# Altium PCB NB3000XN.PcbDoc (part 46 of 71)
Units mil, origin at the board's own origin, x right, y up, seen from the top; angles counter-clockwise.
Board outline 9527.56 x 6929.77 mil, 6 copper layers (Top Layer, GND+SHIELD, MidLayer1, MidLayer2, P2 - 3V3+5V0, Bottom Layer), stack 62.375 mil thick; 832 components, 1027 nets, 4655 pads, 4981 vias.
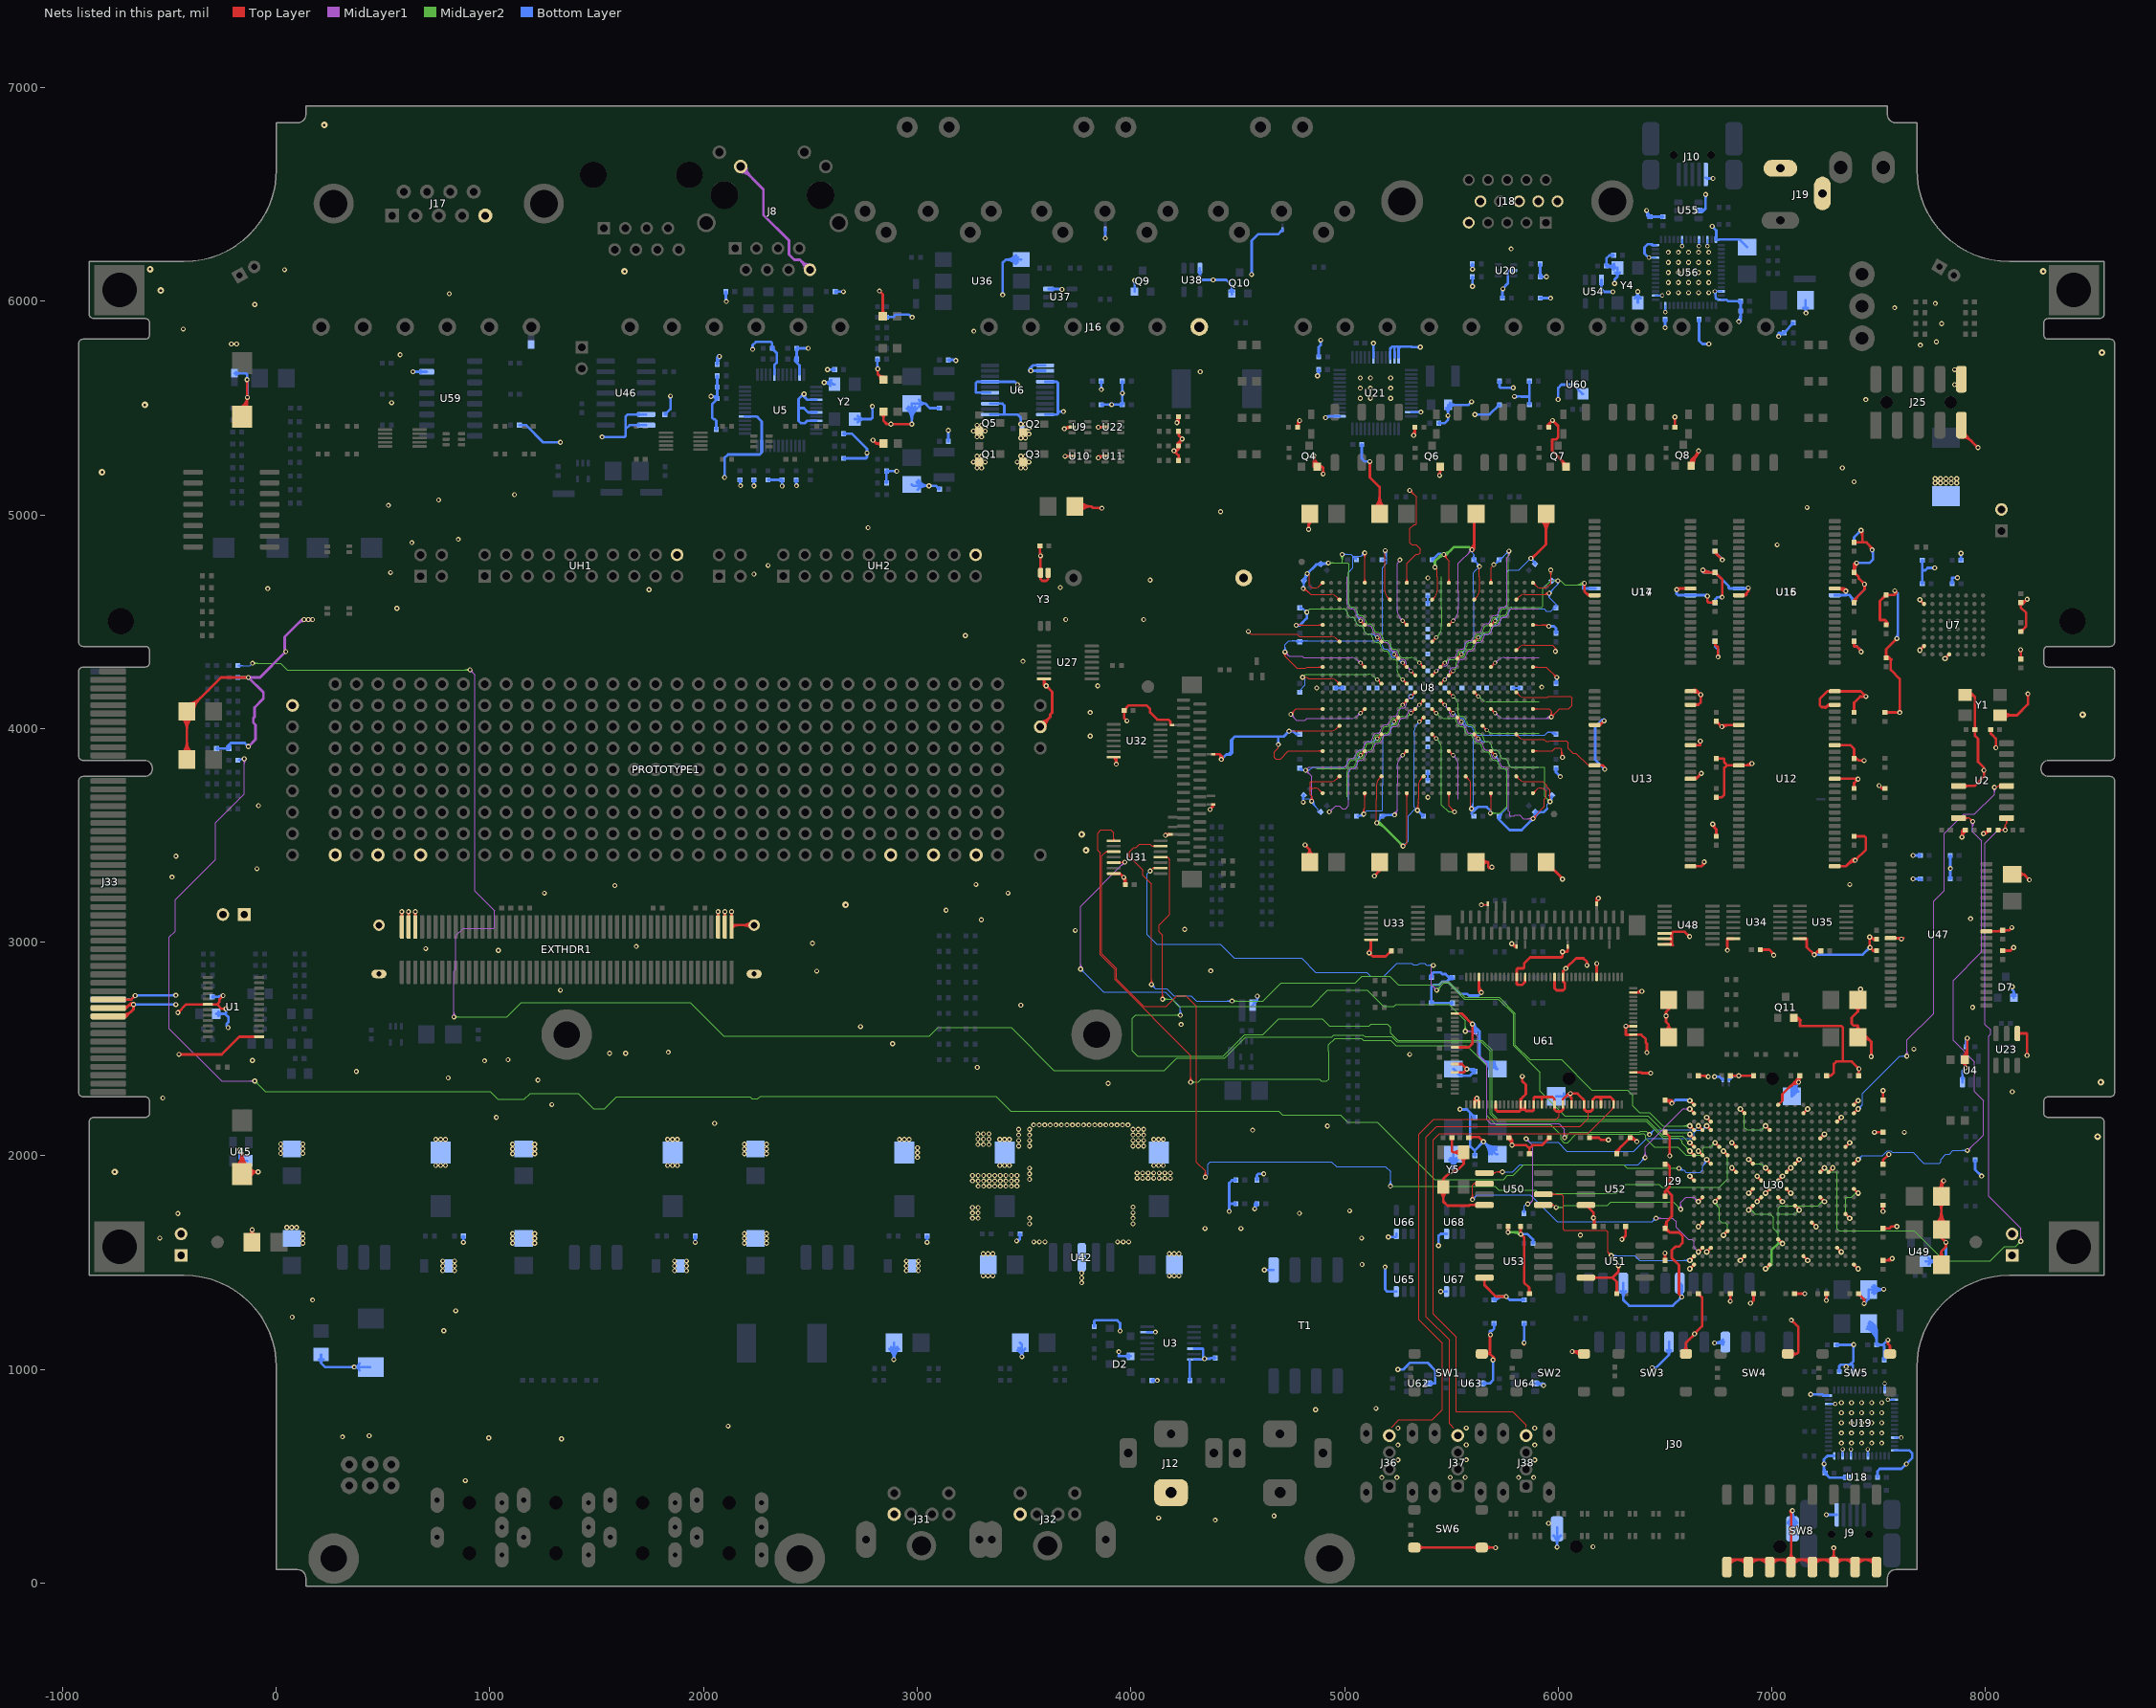
[diagram p50: the nets of this part, all layers, seen from the top]

## Via types
v1: diameter 23, hole 11.81, Top Layer to Bottom Layer, 3672 vias
v2: diameter 26, hole 11.81, Top Layer to Bottom Layer, 461 vias
v3: diameter 19, hole 11.81, Top Layer to Bottom Layer, tented both sides, 396 vias
v4: diameter 23.62, hole 11.81, Top Layer to Bottom Layer, 288 vias
v5: diameter 20, hole 11.81, Top Layer to Bottom Layer, 91 vias
v6: diameter 23, hole 11.81, Top Layer to Bottom Layer, tented both sides, 50 vias
v7: diameter 31, hole 11.81, Top Layer to Bottom Layer, 15 vias
v8: diameter 27.56, hole 11.81, Top Layer to Bottom Layer, tented both sides, 4 vias
v9: diameter 29, hole 11.81, Top Layer to Bottom Layer, 3 vias
v10: diameter 21, hole 11.81, Top Layer to Bottom Layer, 1 vias

## Nets (pads, with @x,y where several pads share a name; then routed paths per layer and width w, separated by ;. In a path a pad name is that pad's centre, name@x,y a point inside that pad or via, vN(x,y) a via of type N, cw(c..) or ccw(c..) an arc to the next point about the centre after c; other vN are vias at no path point) (continued)
GND: (continued)
  Bottom Layer w12: v1@7431.86,1313.87 ccw(c7431.86,1327.15) 7441.25,1317.76 ccw(c7450.64,1308.37) v1@7437.36,1308.37 ; v1(7433.86,4676.04) 7433.86,4651.04 7385.19,4602.37 ; v1@7453.69,2975.04 cw(c7440.41,2975.04) 7449.8,2965.65 cw(c7459.19,2956.26) v1@7459.19,2969.54 ; v1@7465.64,4832.71 cw(c7446.59,4813.66) 7473.52,4813.66 ; C93.2@7469.71,1360.69 cw(c7497.3,1338.74) 7497.3,1374 cw(c7497.3,1409.26) C93.2@7469.71,1387.31 ; C93.2@7479.1,1353.22 cw(c7522.19,1318.94) v1@7522.19,1374 ; C93.2@7479.11,1394.78 ccw(c7522.19,1429.05) v1@7522.19,1374 ; v4(7480,2110) v4@7481.86,2110 ; C90.1@7494.33,495 7494.33,524.33 7505,535 7606.86,535 v1(7629.73,557.88) 7656.86,585 7656.86,608.37 ; 7506.93,1374 ccw(c7506.93,1391.97) v1@7519.64,1379.26 ; v1@7522.52,1374.33 v1@7522.19,1374 ; v1@7522.52,1374.37 v1(7523.52,1375.37) ; v4(7547.7,2006.4) v4@7548.6,2006.4 ; v1(7575.52,4645.04) 7590.19,4630.37 7590.19,4426.37 v1(7585.19,4421.37) ; v1@7581.3,4425.26 ccw(c7559.84,4446.72) 7590.19,4446.72 ; v1@7660,3405 v1(7661.18,3406.18) C238.2@7695.39,3406.18 C238.2@7694.21,3405 ; v1@7661.18,3296.18 C222.2@7695.39,3296.18 ; v1@7665.07,3292.48 cw(c7673.99,3283.56) 7673.99,3296.18 ; v1@7665.07,3300.26 ccw(c7674.92,3310.12) 7674.92,3296.18 ; v1@7665.07,3402.29 cw(c7674.46,3392.9) 7674.46,3406.18 cw(c7674.46,3419.46) v1@7665.07,3410.07 ; C222.2@7691.28,3292.07 ccw(c7681.36,3282.15) 7681.36,3296.18 ccw(c7681.36,3310.21) C222.2@7691.28,3300.29 ; C238.2@7691.28,3402.07 ccw(c7681.36,3392.15) 7681.36,3406.18 ccw(c7681.36,3420.21) C238.2@7691.28,3410.29 ; C222.2@7695.39,3291.71 C222.2@7699.52,3291.71 ; C228.2@7699.55,4682.11 ccw(c7689.63,4692.03) 7703.66,4692.03 ccw(c7717.69,4692.03) C228.2@7707.77,4682.11 ; C227.2@7699.55,4783.89 cw(c7689.63,4773.97) 7703.66,4773.97 cw(c7717.69,4773.97) C227.2@7707.77,4783.89 ; C228.2@7703.66,4678 7703.66,4740 ; C227.2@7703.66,4788 7703.66,4740 ; U49.1@7719.07,1506.69 7806.69,1506.69 7815.19,1515.19 v1(7815.19,1595.04) ; U49.1@7733.62,1492.14 cw(c7768.75,1457.02) 7768.75,1506.69 cw(c7768.75,1556.36) U49.1@7733.62,1521.24 ; v1@7758.3,4748.15 ccw(c7748.91,4738.76) 7748.91,4752.04 ccw(c7748.91,4765.32) v1@7758.3,4755.93 ; v1(7762.19,4752.04) 7728.86,4752.04 7717.86,4741.04 7704.7,4741.04 7703.66,4740 ; C254.2@7831.28,3300.29 ccw(c7821.36,3310.21) 7835.39,3310.21 ccw(c7849.42,3310.21) C254.2@7839.5,3300.29 ; C253.2@7831.28,3402.07 cw(c7821.36,3392.15) 7835.39,3392.15 cw(c7849.42,3392.15) C253.2@7839.5,3402.07 ; v1@7831.64,3341.15 cw(c7822.58,3332.1) 7835.39,3332.1 ; v1@7831.64,3348.93 ccw(c7822.58,3357.99) 7835.39,3357.99 ; C254.2@7835.39,3296.18 7835.39,3344.9 v1(7835.52,3345.04) 7835.39,3345.18 C253.2@7835.39,3406.18 ; 7835.39,3331.43 cw(c7849.14,3331.43) v1@7839.41,3341.15 ; 7835.39,3358.65 ccw(c7849.14,3358.65) v1@7839.41,3348.93 ; C248.2@7839.55,4682.11 ccw(c7829.63,4692.03) 7843.66,4692.03 ccw(c7857.69,4692.03) C248.2@7847.77,4682.11 ; C248.2@7843.66,4678 7843.66,4705.9 7843.8,4706.04 v1(7868.52,4706.04) ; v1@7864.64,4702.15 ccw(c7855.25,4692.76) 7855.25,4706.04 ccw(c7855.25,4719.32) v1@7864.64,4709.93 ; C247.2@7880.89,4792.11 ccw(c7870.97,4802.03) 7885,4802.03 ccw(c7899.03,4802.03) C247.2@7889.11,4792.11 ; v1@7881.3,4816.49 cw(c7872.37,4807.56) 7885,4807.56 ; v1@7881.86,4823.71 v1@7885,4820.56 ; C247.2@7885,4788 7885,4820.37 v1@7885,4820.56 ; 7885,4806.64 cw(c7898.93,4806.64) v1@7889.08,4816.49 ; v1(7885.19,4820.37) v1@7885,4820.56 ; U4.3@7888.49,2362.77 ccw(c7878.57,2372.69) 7892.6,2372.69 ccw(c7906.63,2372.69) U4.3@7896.71,2362.77 ; U4.3@7892.6,2344.88 7892.6,2397.78 v1(7906.86,2412.04) ; C39.1@7905.22,2514.11 ccw(c7895.3,2524.03) 7909.33,2524.03 ccw(c7923.36,2524.03) C39.1@7913.44,2514.11 ; C39.1@7909.33,2510 7909.33,2545.37 7914.66,2550.71 v1(7914.86,2550.71) ; 7909.33,2524.09 cw(c7941.48,2524.09) v1@7918.75,2546.82 ; R163.1@7947.42,1977.41 cw(c7938.34,1968.33) 7951.18,1968.33 cw(c7964.02,1968.33) R163.1@7954.94,1977.41 ; R163.1@7951.18,1981.67 7951.18,1935.68 7981.76,1905.1 v1@7981.86,1905 ; 7972.14,1914.72 ccw(c7981.86,1924.44) v1@7981.86,1910.69 ; 7972.61,1914.25 cw(c7963.55,1905.19) v1@7976.36,1905.19 ; D7.1@8124.12,2749.06 ccw(c8104.11,2769.06) 8132.4,2769.06 ccw(c8160.69,2769.06) D7.1@8140.69,2749.06 ; v1@8126.9,2793.42 8124.74,2795.59 8124.65,2795.59 8125.19,2795.04 v1(8125.19,2791.71) 8125.19,2777.21 8132.4,2770 D7.1@8132.4,2739.79 ; -239.81,2665 -223.5,2648.69 -223.5,2626.09 -233,2616.59 ; 210,1030 228.29,1011.71 v1(365.19,1011.71) v1@365.19,1011.81 ; v1@2435,5141.71 2435.19,5141.71 v1(2435.19,5136.71) 2432.52,5139.37 2434.86,5141.71 v1@2435,5141.71 ; v1@2435,5141.71 2434,5142.71 R41.2@2434,5163.82 2435,5163.82 v1@2435,5141.71 ; 2435.67,5715.97 cw(c2449.7,5715.97) 2439.78,5725.89 ccw(c2449.7,5715.97) 2435.67,5715.97 ; 2435.67,5715.97 ccw(c2421.64,5715.97) 2431.56,5725.89 cw(c2421.64,5715.97) 2435.67,5715.97 ; C47.1@2435.67,5775.04 2438.15,5777.52 C47.1@2440.63,5780 ; C47.1@2435.67,5775.04 C47.1@2435.67,5780 C47.1@2440.63,5780 ; 2445,5455 2445,5500 ; U38.3@4319.14,6137.23 cw(c4308.54,6126.63) 4323.52,6126.63 ccw(c4308.54,6126.63) U38.3@4319.14,6137.23 ; U38.3@4319.14,6137.23 cw(c4309.21,6127.31) 4323.24,6127.31 cw(c4337.27,6127.31) U38.3@4327.35,6137.23 ; U38.3@4327.35,6137.23 ccw(c4336.6,6127.99) 4323.52,6127.99 cw(c4336.6,6127.99) U38.3@4327.35,6137.23 ; 4455,3879.04 4466.19,3879.04 4474.86,3887.71 4474.86,3951.04 ; 4455,3879.04 4468.86,3892.9 4468.86,3945.04 4474.86,3951.04 ; 4474.86,3951.04 4485.86,3962.04 4690.19,3962.04 ; v1@4917.69,4774.2 v1(4924.52,4775.04) 4918.52,4775.04 v1@4917.69,4774.2 ; 5235,5788.21 5263.21,5788.21 ; 5415.06,2858.37 5449.91,2858.37 5457.78,2850.5 5473.06,2850.5 5493.52,2830.04 ; 5480.19,2816.71 5493.52,2830.04 ; 5573.96,2216.71 5587.52,2203.14 ; 5573.96,2216.71 5587.52,2203.14 ; 5587.52,2203.14 C338.2@5610,2180.67 5587.52,2203.14 ; 5587.52,2203.14 5587.52,2041.71 5592.19,2041.71 5608.86,2025.04 ; 5594.19,3603.37 5604.86,3614.04 ; 5594.19,3603.37 5604.86,3614.04 ; C338.2@5600.08,2190.59 cw(c5590.16,2180.67) 5604.19,2180.67 ccw(c5590.16,2180.67) C338.2@5600.08,2190.59 ; C338.2@5600.08,2190.59 ccw(c5610,2200.51) 5610,2186.48 cw(c5610,2200.51) C338.2@5600.08,2190.59 ; 5604.86,3614.04 5606.86,3616.04 ; 5604.86,3614.04 5606.86,3616.04 ; 5606.86,3616.04 5624.19,3633.37 ; v1@5739.52,6058.37 5740.36,6059.21 5764.52,6083.37 5764.52,6135.41 5770.82,6141.71 ; v1@6006.9,3775 v1(6010,3775) v1@6006.86,3778.14 ; v1@6006.86,3775.04 v1@6006.9,3775 ; v1@6006.86,3775.04 v1@6006.86,3778.14 ; 6122.52,4667.43 cw(c6135.8,4667.43) 6126.41,4676.82 ccw(c6135.8,4667.43) 6122.52,4667.43 ; 6122.52,4667.43 ccw(c6109.25,4667.43) 6118.64,4676.82 cw(c6109.25,4667.43) 6122.52,4667.43 ; 6130,4655.75 6115.9,4655.75 6115.9,4674.08 v1(6122.52,4680.71) 6122.52,4663.22 6130,4655.75 ; 6681.86,6425 6690.19,6433.33 ; 7348.52,4625.04 7362.52,4625.04 7385.19,4602.37 ; 5765.93,6136.82 cw(c5780.25,6122.5) 5783.05,6142.55 ccw(c5780.25,6122.5) 5765.93,6136.82 ; C324.2@5895.78,3613.7 ccw(c5908.63,3626.55) 5908.63,3608.37 cw(c5908.63,3626.55) C324.2@5895.78,3613.7
  other v1: 6163,170 5955,280 4395,295 4130,305 4670,315 885,480 5174.79,494.61 5245,494.61 5814.79,494.61 5885,494.61 5494.79,495 5565,495 5250.17,576.71 5890.17,576.71 5570.17,577.1 5250.17,646.92 5570.17,647.31 5890.17,646.92 1335,675 995,680 310,685 435,690 5250.17,725.66 5890.17,725.66 5570.17,726.05 2115,735 5147,818 7348,1013 7383.52,1116.71 4115,1175 784.17,1181.5 75,1245 840,1275 170,1325 5450,1364.88 3770,1406.01 3770,1428.51 3309.02,1438.07 3331.52,1438.07 3354.02,1438.07 4180,1438.07 4202.5,1438.07 4225,1438.07 3770,1451.01 779.17,1462.5 835,1462.5 1864.17,1462.5 1920,1462.5 2949.17,1462.5 3005,1462.5 779.17,1485 835,1485 1864.17,1485 1920,1485 2949.17,1485 3005,1485 5082.52,1491.71 779.17,1507.5 835,1507.5 1864.17,1507.5 1920,1507.5 2949.17,1507.5 3005,1507.5 3309.02,1541.93 3331.52,1541.93 3354.02,1541.93 4180,1541.93 4202.5,1541.93 4225,1541.93 125,1590.98 1106.14,1590.98 1210,1590.98 2191.14,1590.98 2295,1590.98 3546,1597.5 3572,1597.5 3597.99,1597.5 3938.01,1597.5 3964,1597.5 3990,1597.5 125,1613.48 1106.14,1613.48 1210,1613.48 2191.14,1613.48 2295,1613.48 -545,1615 5080,1615 6104,1629 125,1635.98 1106.14,1635.98 1210,1635.98 2191.14,1635.98 2295,1635.98 4347,1660 4515,1660 50.08,1664.92 72.58,1664.92 95.08,1664.92 3526,1682.01 4010,1682.01 3259.02,1708 3285.02,1708 3526,1708.01 4010,1708.01 -460,1730 4789,1731 3259.02,1733 3285.02,1733 4010,1734 5024,1743 3259.02,1758 3285.02,1758 4010,1760 3285.02,1858 3311.01,1858 3337.01,1858 3363,1858 3389,1858 3415,1858 3440.99,1858 3466.99,1858 3259.02,1883 3285.02,1883 3311.01,1883 3337.01,1883 3363,1883 3389,1883 3415,1883 3440.99,1883 3466.99,1883 3526,1889.98 4029.02,1895 4055.02,1895 4081.01,1895 4107.01,1895 4133,1895 4159,1895 4185,1895 7981.86,1905.19 3259.02,1908 3285.02,1908 3311.01,1908 3337.01,1908 3363,1908 3389,1908 3415,1908 3440.99,1908 3466.99,1908 3526,1915.98 4029.02,1920 4055.02,1920 4081.01,1920 4107.01,1920 4133,1920 4159,1920 4185,1920 3526.01,1941.97 747.01,1954.88 769.51,1954.88 792.01,1954.88 1832.01,1954.88 1854.51,1954.88 1877.01,1954.88 3386.46,1954.88 3408.96,1954.88 3431.46,1954.88 4107.01,1954.88 4129.51,1954.88 4152.01,1954.88 3001.3,1992.64 1106.14,2010 1210,2010 2191.14,2010 2295,2010 21.14,2010.98 125,2010.98 3001.3,2015.14 1106.14,2032.5 1210,2032.5 2191.14,2032.5 2295,2032.5 21.14,2033.48 125,2033.48 3001.3,2037.64 3474.99,2045.96 3526.01,2045.96 4009.99,2045.96 4034.99,2045.96 4059.99,2045.96 3284.02,2053 3310.02,2053 3336.01,2053 1106.14,2055 1210,2055 2191.14,2055 2295,2055 21.14,2055.98 125,2055.98 3474.99,2071.95 3526.01,2071.95 4009.99,2071.95 4034.99,2071.95 4059.99,2071.95 747.01,2076.93 769.51,2076.93 792.01,2076.93 1832.01,2076.93 1854.51,2076.93 1877.01,2076.93 2917.01,2076.93 2939.51,2076.93 2962.01,2076.93 3386.46,2076.93 3408.96,2076.93 3431.46,2076.93 4107.01,2076.93 4129.51,2076.93 4152.01,2076.93 3284.02,2078 3310.02,2078 3336.01,2078 3474.99,2097.95 3526.01,2097.95 4009.99,2097.95 4034.99,2097.95 4059.99,2097.95 3284.02,2103 3310.02,2103 3336.01,2103 7620,2110 4570,2120 3474.99,2123.94 3526.01,2123.94 4009.99,2123.94 4034.99,2123.94 4059.99,2123.94 4920,2140 3545,2145 3571,2145 3596.99,2145 3622.99,2145 3648.98,2145 3674.98,2145 3700.98,2145 3726.97,2145.01 3752.97,2145.01 3778.96,2145.01 3804.96,2145.01 3830.96,2145.01 3856.95,2145.01 3882.95,2145.01 3908.94,2145.01 3934.94,2145.01 3960.94,2145.01 3986.93,2145.01 2052,2152 1030,2180 1290,2240 -531,2271 8125,2300 3893.94,2338.94 1225,2355 805,2365 6702.52,2370.71 375,2395 3281,2414 975,2445 1085,2450 5305,2475 1560,2480 1635,2480 1835,2485 7665,2500 2885,2525 2735,2605 4235,2615 7940,2695 1330,2775 7415,2780 2530,2865 4374,2866 7009,2939 700,2970 1685,2980 5782.86,2993.04 2510,2995 3740,3055 4252,3060 3300,3105 7930,3110 619.35,3143.04 650.85,3143.04 2068.17,3143.04 2099.67,3143.04 2131.17,3143.04 3135,3150 1255,3230 3425,3230 1585,3265 3275,3270 7365,3270 7661.18,3296.37 -90,3344 -83,3639 5390,3678 3810,3965 3810,4075 4870,4190 5923,4194 3845,4200 3495,4315 45,4360 3225,4435 3695,4510 4060,4510 565,4563 1745,4650 -40,4655 3670,4660 4090,4695 5390,4705 2236,4723 535,4730 2302,4764 7025,4860 635,4870 852,4886 2770,4940 4420,5015 7165,5035 525,5045 760,5070 1115,5095 7385,5155 3280,5220 3301.57,5220 3485,5220 3506.57,5220 7330,5220 3263.19,5247.6 3318.39,5247.6 3468.19,5247.6 3523.39,5247.6 3280,5275.2 3301.57,5275.2 3485,5275.2 3506.57,5275.2 3485,5360 3506.57,5360 3280,5365 3301.57,5365 3523.39,5378.6 3263.19,5392.6 3318.39,5392.6 3689,5403 3523.39,5406.6 3280,5420.2 3301.57,5420.2 2877,5425 3506.57,5425.2 5484.37,5465 3685,5483.57 3910,5516.37 540,5525 7440,5540 3861.86,5586.9 7855,5610 4325,5670 7855,5680 580,5750 2490,5780 7695,5795 5135.19,5804.04 7770,5810 3265,5860 -435,5870 7795,5895 7160,5945 7575,5970 -100,5985 7765,5990 810,6035 6372.5,6045.19 4385,6100.04 39.01,6147.63 5780,6245 3880,6295 6690,6500
  other v4: 4865,812 -112,2446 3485,2705 1040,2962 -488,3305 -469,3403 7764.51,5149.9 7789.61,5149.9 7814.7,5149.9 7839.8,5149.9 7864.8,5150 7764.51,5169.9 7789.61,5169.9 7814.7,5169.9 7839.8,5169.9 7864.8,5170 5074.13,5546.38 5121.38,5546.38 5215.87,5546.38 5074.13,5593.62 5121.38,5593.62 5215.87,5593.62 5074.13,5640.87 5121.38,5640.87 5215.87,5640.87 -210,5800 -185,5800
  other v5: 7528.27,935.66
  other v6: 7325.51,655.51 7372.76,655.51 7420,655.51 7467.24,655.51 7514.49,655.51 7325.51,702.76 7372.76,702.76 7420,702.76 7467.24,702.76 7514.49,702.76 7325.51,750 7372.76,750 7420,750 7467.24,750 7514.49,750 7325.51,797.24 7372.76,797.24 7420,797.24 7467.24,797.24 7514.49,797.24 7325.51,844.49 7372.76,844.49 7420,844.49 7467.24,844.49 7514.49,844.49 6515.51,6040.51 6562.76,6040.51 6610,6040.51 6657.24,6040.51 6704.49,6040.51 6515.51,6087.76 6562.76,6087.76 6610,6087.76 6657.24,6087.76 6704.49,6087.76 6515.51,6135 6562.76,6135 6610,6135 6657.24,6135 6704.49,6135 6515.51,6182.24 6562.76,6182.24 6610,6182.24 6657.24,6182.24 6704.49,6182.24 6515.51,6229.49 6562.76,6229.49 6610,6229.49 6657.24,6229.49 6704.49,6229.49
  other v7: -755.79,1925 8525,2090 8540,2345 2665,3175 3790,3430 3770,3505 8455,4065 -815,5200 -615,5515 8545,5760 -540,6050 1630,6140 8270,6140 -590,6150 225,6825
GOLD_FLASH.DIN: U30.W12 U50.5 | length 1141.5
  Top Layer w4: U50.5@5930.59,1770 5976.9,1770 ; U50.5@5971.2,1766 cw(c5976.9,1763.94) 5976.9,1770 ; U50.5@5971.2,1774 ccw(c5976.9,1776.06) 5976.9,1770 ; v1(5990.19,1758.37) 5988.52,1758.37 5976.9,1770
  Top Layer w8: v2(6655.67,1786.26) U30.W12@6675.35,1805.94 ; v2@6655.67,1795.26 ccw(c6655.67,1816.99) 6671.03,1801.62 ccw(c6686.4,1786.26) v2@6664.67,1786.26 ; U30.W12@6669.51,1805.94 cw(c6655.41,1805.94) 6665.38,1795.97 cw(c6675.35,1786) U30.W12@6675.35,1800.1
  MidLayer1 w4: v1@6566.81,1756.76 ccw(c6550.59,1772.98) 6573.52,1772.98 ccw(c6596.46,1772.98) v1@6580.24,1756.76 ; v1@6569.64,1753.93 ccw(c6560.25,1763.32) 6573.52,1763.32 ccw(c6586.8,1763.32) v1@6577.41,1753.93 ; v1(6573.52,1750.04) 6573.52,1781.04 6598.52,1806.04 6635.89,1806.04 v2(6655.67,1786.26) ; v2@6644.67,1786.26 ccw(c6618.11,1786.26) 6636.89,1805.04 ccw(c6655.67,1823.82) v2@6655.67,1797.26 ; v2@6648.67,1786.26 ccw(c6631.77,1786.26) 6643.72,1798.21 ccw(c6655.67,1810.16) v2@6655.67,1793.26
  MidLayer2 w4: v1(5990.19,1758.37) 6019.21,1758.37 6029.54,1768.71 6230.88,1768.71 6245.54,1783.37 6540.19,1783.37 v1(6573.52,1750.04) ; v1@5994.08,1754.49 cw(c6003.47,1745.1) 6003.47,1758.37 cw(c6003.47,1771.65) v1@5994.08,1762.26 ; v1@5996.91,1751.66 cw(c6013.13,1735.44) 6013.13,1758.37 cw(c6013.13,1781.31) v1@5996.91,1765.09 ; v1@6564.02,1750.04 ccw(c6541.09,1750.04) 6557.31,1766.26 ccw(c6573.52,1782.48) v1@6573.52,1759.54 ; v1@6568.02,1750.04 ccw(c6554.75,1750.04) 6564.14,1759.43 ccw(c6573.52,1768.82) v1@6573.52,1755.54
GOLD_FLASH.DOUT: U30.W18 U50.2 | length 1681.4
  Top Layer w4: v1@5591.81,1802.43 ccw(c5575.59,1818.64) 5598.52,1818.64 ccw(c5621.46,1818.64) v1@5605.24,1802.43 ; v1@5594.64,1799.6 ccw(c5585.25,1808.99) 5598.52,1808.99 ccw(c5611.8,1808.99) v1@5602.41,1799.6 ; v1(5598.52,1795.71) 5598.52,1862 5606.52,1870 ; U50.2@5614.91,1864.79 ccw(c5606.52,1860.65) 5606.52,1870 ; U50.2@5614.91,1875.21 cw(c5606.53,1879.35) 5606.53,1870 ; U50.2@5655,1870 5606.52,1870
  Top Layer w8: v2(6655.67,1550.04) U30.W18@6675.35,1569.72 ; v2@6655.67,1559.04 ccw(c6655.67,1580.77) 6671.03,1565.4 ccw(c6686.4,1550.04) v2@6664.67,1550.04 ; U30.W18@6669.51,1569.72 cw(c6655.41,1569.72) 6665.38,1559.75 cw(c6675.35,1549.78) U30.W18@6675.35,1563.88
  MidLayer1 w4: v1(6457.86,1708.37) 6535.52,1708.37 6552.19,1691.71 6552.19,1665.71 6608.19,1609.71 6625.86,1609.71 6635.52,1600.04 6635.52,1574.18 6640.19,1569.52 6640.19,1565.52 v2(6655.67,1550.04) ; v1@6461.75,1704.49 cw(c6471.14,1695.1) 6471.14,1708.37 cw(c6471.14,1721.65) v1@6461.75,1712.26 ; v1@6464.57,1701.66 cw(c6480.79,1685.44) 6480.79,1708.37 cw(c6480.79,1731.31) v1@6464.57,1715.09
  Bottom Layer w4: v1(5598.52,1795.71) 5619.52,1816.71 5870.92,1816.71 5995.92,1691.71 6441.19,1691.71 v1(6457.86,1708.37) ; v1@5598.52,1801.21 ccw(c5598.52,1814.49) 5607.91,1805.1 ccw(c5617.3,1795.71) v1@5604.02,1795.71 ; v1@5598.52,1805.21 ccw(c5598.52,1828.14) 5614.74,1811.93 ccw(c5630.96,1795.71) v1@5608.02,1795.71 ; v1@6448.36,1708.37 cw(c6425.42,1708.37) 6441.64,1692.16 cw(c6457.86,1675.94) v1@6457.86,1698.87 ; v1@6452.36,1708.37 cw(c6439.08,1708.37) 6448.47,1698.99 cw(c6457.86,1689.6) v1@6457.86,1702.87
GOLD_FLASH.FLASH_CS_N: U30.Y2 U50.1 | length 1461.2
  Top Layer w4: U50.1@5655,1920 5704.52,1920 ; U50.1@5694.83,1914.29 cw(c5704.52,1908.92) 5704.52,1920 ; U50.1@5694.83,1925.71 ccw(c5704.52,1931.08) 5704.52,1920 ; v1@5732.47,1918.32 ccw(c5716.26,1902.11) 5716.26,1925.04 ccw(c5716.26,1947.98) v1@5732.47,1931.76 ; v1@5735.3,1921.15 ccw(c5725.91,1911.76) 5725.91,1925.04 ccw(c5725.91,1938.32) v1@5735.3,1928.93 ; v1(5739.19,1925.04) 5709.57,1925.04 5704.52,1920
  Top Layer w8: v2@6616.3,2210.33 cw(c6616.3,2188.6) 6631.66,2203.97 cw(c6647.03,2219.33) v2@6625.3,2219.33 ; v2(6616.3,2219.33) U30.Y2@6635.98,2199.65 ; U30.Y2@6630.14,2199.65 ccw(c6616.04,2199.65) 6626.01,2209.62 ccw(c6635.98,2219.59) U30.Y2@6635.98,2205.49
  MidLayer1 w4: v1@6400.14,1998.43 ccw(c6383.92,2014.64) 6406.86,2014.64 ccw(c6429.79,2014.64) v1@6413.57,1998.43 ; v1@6402.97,1995.6 ccw(c6393.58,2004.99) 6406.86,2004.99 ccw(c6420.14,2004.99) v1@6410.75,1995.6 ; v1(6406.86,1991.71) 6406.86,2041.71 6584.48,2219.33 v2(6616.3,2219.33) ; v2@6608.52,2211.55 ccw(c6589.74,2192.77) 6589.74,2219.33 ccw(c6589.74,2245.89) v2@6608.52,2227.11 ; v2@6611.35,2214.38 ccw(c6599.4,2202.43) 6599.4,2219.33 ccw(c6599.4,2236.23) v2@6611.35,2224.28
  Bottom Layer w4: v1(5739.19,1925.04) 5787.52,1925.04 5820.52,1958.04 6373.19,1958.04 v1(6406.86,1991.71) ; v1@6397.36,1991.71 cw(c6374.42,1991.71) 6390.64,1975.49 cw(c6406.86,1959.27) v1@6406.86,1982.21 ; v1@6401.36,1991.71 cw(c6388.08,1991.71) 6397.47,1982.32 cw(c6406.86,1972.93) v1@6406.86,1986.21
GOLD_FLASH.SCLK: U30.Y19 U50.6 | length 1299.2
  Top Layer w4: U50.6@5930.59,1820 6015,1820 6023.52,1811.48 6023.52,1656.48 6028.96,1651.04 6223.52,1651.04 6231.86,1642.71 6231.86,1550.04 v1(6248.52,1533.37) ; U50.6@5965.62,1814.5 cw(c5978.9,1801.22) 5978.9,1820 cw(c5978.9,1838.78) U50.6@5965.62,1825.5 ; U50.6@5968.45,1811.67 cw(c5988.56,1791.56) 5988.56,1820 cw(c5988.56,1848.44) U50.6@5968.45,1828.33 ; v1@6239.02,1533.37 ccw(c6216.09,1533.37) 6232.31,1549.59 ccw(c6248.52,1565.81) v1@6248.52,1542.87 ; v1@6243.02,1533.37 ccw(c6229.75,1533.37) 6239.13,1542.76 ccw(c6248.52,1552.15) v1@6248.52,1538.87
  Top Layer w8: v2(6616.3,1510.67) U30.Y19@6635.98,1530.35 ; v2@6616.3,1519.67 ccw(c6616.3,1541.4) 6631.66,1526.03 ccw(c6647.03,1510.67) v2@6625.3,1510.67 ; U30.Y19@6630.14,1530.35 cw(c6616.04,1530.35) 6626.01,1520.38 cw(c6635.98,1510.41) U30.Y19@6635.98,1524.51
  Bottom Layer w4: v1(6248.52,1533.37) 6357.29,1533.37 6380,1510.67 v2(6616.3,1510.67) ; v1@6252.41,1529.49 cw(c6261.8,1520.1) 6261.8,1533.37 cw(c6261.8,1546.65) v1@6252.41,1537.26 ; v1@6255.24,1526.66 cw(c6271.46,1510.44) 6271.46,1533.37 cw(c6271.46,1556.31) v1@6255.24,1540.09 ; v2@6608.52,1502.89 ccw(c6589.74,1484.11) 6589.74,1510.67 ccw(c6589.74,1537.23) v2@6608.52,1518.45 ; v2@6611.35,1505.72 ccw(c6599.4,1493.77) 6599.4,1510.67 ccw(c6599.4,1527.57) v2@6611.35,1515.62
HOST_AUDIO.L: R1.1 U30.V8 | length 9648.9
  Top Layer w8: v2@6695.04,1974.11 cw(c6695.04,1952.38) 6710.4,1967.75 cw(c6725.77,1983.11) v2@6704.04,1983.11 ; v2(6695.04,1983.11) U30.V8@6714.72,1963.43 ; U30.V8@6708.88,1963.43 ccw(c6694.78,1963.43) 6704.75,1973.4 ccw(c6714.72,1983.37) U30.V8@6714.72,1969.27
  MidLayer1 w4: v1@-156.19,3851.66 cw(c-172.41,3835.44) -149.48,3835.44 cw(c-126.54,3835.44) v1@-142.76,3851.66 ; v1@-153.36,3854.49 cw(c-162.75,3845.1) -149.48,3845.1 cw(c-136.2,3845.1) v1@-145.59,3854.49 ; v1(-149.48,3858.37) -149.48,3694.33 -283.81,3560 -283.81,3387.7 -472.5,3199.01 -472.5,3052.25 -500.19,3024.56 -500.19,2595.44 -254.25,2349.5 v1@-101.02,2349.5 ; -124.72,2349.5 ccw(c-124.72,2374.28) v1@-107.19,2356.76 ; -122.11,2349.5 cw(c-122.11,2328.41) v1@-107.19,2343.32 ; -115.06,2349.5 ccw(c-115.06,2364.62) v1@-104.36,2353.93 ; -112.45,2349.5 cw(c-112.45,2338.07) v1@-104.36,2346.15
  MidLayer2 w4: v1@-100.48,2340.54 cw(c-100.48,2317.61) -84.26,2333.82 cw(c-68.04,2350.04) v1@-90.98,2350.04 ; v1@-100.48,2344.54 cw(c-100.48,2331.26) -91.09,2340.65 cw(c-81.7,2350.04) v1@-94.98,2350.04 ; v1(-100.48,2350.04) -50.44,2300 1001.31,2300 1036.31,2265 1161.31,2265 1188.69,2292.37 1412.63,2292.37 1485,2220 1535.92,2220 1549.21,2233.29 1591.92,2276 2216.62,2276 2226.12,2266.5 2253.88,2266.5 2265.88,2278.5 3368.88,2278.5 3437.38,2210 4691.71,2210 4710,2191.71 4981.86,2191.71 5015.19,2158.37 5153.88,2158.37 5422.38,1889.87 5743.96,1889.87 5762.96,1908.87 5789.36,1908.87 5838.19,1957.71 6305.86,1957.71 6321.86,1941.71 v1(6565.19,1941.71) ; v1@6558.47,1934.99 ccw(c6542.26,1918.77) 6542.26,1941.71 ccw(c6542.26,1964.64) v1@6558.47,1948.43 ; v1@6561.3,1937.82 ccw(c6551.91,1928.43) 6551.91,1941.71 ccw(c6551.91,1954.99) v1@6561.3,1945.6
  Bottom Layer w4: R1.1@-178.82,3851.36 R1.1@-171.81,3858.37 ; R1.1@-177.72,3851.13 cw(c-164.3,3842.32) -164.3,3858.37 ; R1.1@-174.37,3848.94 cw(c-156.89,3837.46) v1@-156.89,3858.37 ; R1.1@-171.03,3846.74 cw(c-149.48,3832.6) v1(-149.48,3858.37) R1.1@-171.81,3858.37 ; v1@-156.32,3851.79 ccw(c-171.81,3836.88) R1.1@-171.81,3858.37 ; v1@-156.32,3864.96 cw(c-171.81,3879.87) R1.1@-171.81,3858.37 ; v1@-153.44,3854.56 ccw(c-162.4,3845.93) -162.4,3858.37 ccw(c-162.4,3870.82) v1@-153.44,3862.19 ; v1(6565.19,1941.71) 6573.52,1933.37 6588.86,1933.37 ; v1@6566.63,1942.12 ccw(c6578.24,1945.45) 6578.24,1933.37 ; v1@6570.48,1943.22 ccw(c6583.55,1946.97) 6583.55,1933.37 ; v1@6574.32,1944.33 ccw(c6588.86,1948.49) 6588.86,1933.37 ; 6681.3,1957.15 ccw(c6667.95,1970.5) v2@6685.07,1978.47 ; 6685.34,1961.19 ccw(c6673.47,1973.07) v2@6688.69,1980.16 ; 6689.39,1965.24 ccw(c6678.98,1975.64) v2@6692.32,1981.84 ; 6693.43,1969.28 ccw(c6684.5,1978.2) v2@6695.95,1983.53 ; v2(6695.04,1983.11) 6695.04,1970.89 6675.19,1951.04 6675.19,1933.37 6665.52,1923.71 6598.52,1923.71 6588.86,1933.37
HOST_AUDIO.R: R14.1 U30.Y7 | length 9885
  Top Layer w8: v2@6616.3,2013.48 cw(c6616.3,1991.75) 6631.66,2007.12 cw(c6647.03,2022.48) v2@6625.3,2022.48 ; v2(6616.3,2022.48) U30.Y7@6635.98,2002.8 ; U30.Y7@6630.14,2002.8 ccw(c6616.04,2002.8) 6626.01,2012.77 ccw(c6635.98,2022.74) U30.Y7@6635.98,2008.64
  MidLayer1 w4: v1@825.14,2656.76 ccw(c808.92,2672.98) 831.86,2672.98 ccw(c854.79,2672.98) v1@838.57,2656.76 ; v1@827.97,2653.93 ccw(c818.58,2663.32) 831.86,2663.32 ccw(c845.14,2663.32) v1@835.75,2653.93 ; v1(831.86,2650.04) 831.86,2863.37 840.19,2871.71 840.19,2995 ; 840,2995 840,3030 875.71,3065.71 1018.08,3065.71 1022,3069.63 1022,3148 930,3240 930,4251.9 v1(906.86,4275.04) ; v1@906.86,4265.54 cw(c906.86,4242.61) 923.07,4258.82 cw(c939.29,4275.04) v1@916.36,4275.04 ; v1@906.86,4269.54 cw(c906.86,4256.26) 916.25,4265.65 cw(c925.64,4275.04) v1@912.36,4275.04
  MidLayer2 w4: v1(-110.81,4306.04) 20,4306.04 51,4275.04 v1(906.86,4275.04) ; v1@-106.92,4302.15 cw(c-97.53,4292.76) -97.53,4306.04 cw(c-97.53,4319.32) v1@-106.92,4309.93 ; v1@-104.09,4299.32 cw(c-87.87,4283.11) -87.87,4306.04 cw(c-87.87,4328.98) v1@-104.09,4312.76 ; v1(831.86,2650.04) 1080,2650.04 1146.67,2716.71 1936.98,2716.71 2093.69,2560 3056.27,2560 3096.98,2600.71 3439.29,2600.71 3640.63,2399.37 4156,2399.37 4215,2458.37 4438.19,2458.37 4537.19,2557.37 4940,2557.37 4948.62,2566 5086.86,2566 5095.36,2557.5 5221.5,2557.5 5245.63,2533.37 5640.19,2533.37 5682.86,2490.71 5682.86,2194.77 5715.25,2162.37 6411.19,2162.37 6490.19,2083.37 6565.19,2083.37 6580,2068.56 6580,2058.78 v2@6615.19,2023.59 ; v1@835.75,2646.15 cw(c845.14,2636.76) 845.14,2650.04 cw(c845.14,2663.32) v1@835.75,2653.93 ; v1@838.57,2643.32 cw(c854.79,2627.11) 854.79,2650.04 cw(c854.79,2672.98) v1@838.57,2656.76 ; v1@900.14,4268.32 ccw(c883.92,4252.11) 883.92,4275.04 ccw(c883.92,4297.98) v1@900.14,4281.76 ; v1@902.97,4271.15 ccw(c893.58,4261.76) 893.58,4275.04 ccw(c893.58,4288.32) v1@902.97,4278.93 ; v2@6605.3,2022.48 ccw(c6578.74,2022.48) 6597.52,2041.26 ccw(c6616.3,2060.04) v2@6616.3,2033.48 ; v2@6609.3,2022.48 ccw(c6592.4,2022.48) 6604.35,2034.43 ccw(c6616.3,2046.38) v2@6616.3,2029.48 ; v2@6615.19,2022.48 v2@6615.19,2023.59 ; v2(6616.3,2022.48) v2@6615.19,2023.59
  Bottom Layer w4: R14.1@-176.48,4295.71 -176.48,4295.49 -178.82,4295.49 R14.1@-178.82,4295 -121.85,4295 v1(-110.81,4306.04) ; R14.1@-175.06,4291.24 cw(c-165.98,4282.16) -165.98,4295 cw(c-165.98,4307.84) R14.1@-175.06,4298.76 ; R14.1@-172.23,4288.41 cw(c-156.32,4272.5) -156.32,4295 cw(c-156.32,4317.5) R14.1@-172.23,4301.59
HOST_CLK.CS_N: R30.1 U2.9 U30.E9 | length 3928.6
  Top Layer w4: R30.1@8059.51,3525 8076.48,3525 ; R30.1@8067.38,3520 cw(c8076.48,3514.21) 8076.48,3525 ; R30.1@8067.38,3530 ccw(c8076.48,3535.79) 8076.48,3525 ; v1@8084.18,3520.49 ccw(c8076.52,3516.32) 8076.52,3525.04 ; v1@8084.18,3529.59 cw(c8076.52,3533.76) 8076.52,3525.04 ; v1@8085.81,3531.76 ccw(c8069.59,3547.98) 8092.52,3547.98 ccw(c8115.46,3547.98) v1@8099.24,3531.76 ; v1@8088.64,3528.93 ccw(c8079.25,3538.32) 8092.52,3538.32 ccw(c8105.8,3538.32) v1@8096.41,3528.93 ; U2.9@8090.73,3572.56 cw(c8075.03,3555) 8098.58,3555 ; U2.9@8093.4,3575.54 cw(c8083.03,3563.94) 8098.58,3563.94 cw(c8114.14,3563.95) U2.9@8103.77,3575.54 ; U2.9@8098.58,3581.34 8098.58,3555 ; U2.9@8106.44,3572.56 ccw(c8122.14,3555) 8098.58,3555 ; 8076.48,3525 8076.52,3525.04 ; 8076.52,3525.04 v1(8092.52,3525.04) 8092.52,3548.94 8098.58,3555
  Top Layer w8: U30.E9@7226.54,1924.06 v2(7246.22,1943.74) ; U30.E9@7226.54,1929.9 ccw(c7226.54,1944) 7236.51,1934.03 ccw(c7246.48,1924.06) U30.E9@7232.38,1924.06 ; v2@7237.22,1943.74 cw(c7215.49,1943.74) 7230.86,1928.38 cw(c7246.22,1913.01) v2@7246.22,1934.74
  MidLayer1 w4: v1@8085.81,3518.32 ccw(c8069.59,3502.11) 8069.59,3525.04 ccw(c8069.59,3547.98) v1@8085.81,3531.76 ; v1@8088.64,3521.15 ccw(c8079.25,3511.76) 8079.25,3525.04 ccw(c8079.25,3538.32) v1@8088.64,3528.93 ; v1(8092.52,3525.04) 8059.84,3525.04 7997.86,3463.06 7997.86,2615.67 8023.52,2590 8023.52,2569.71 8015.19,2561.37 8015.48,2561.09 8015.48,1811.35 8165.19,1661.64 v1(8165.19,1600.04) ; v1@8158.47,1606.76 ccw(c8142.26,1622.98) 8165.19,1622.98 ccw(c8188.13,1622.98) v1@8171.91,1606.76 ; v1@8161.3,1603.93 ccw(c8151.91,1613.32) 8165.19,1613.32 ccw(c8178.47,1613.32) v1@8169.08,1603.93
  MidLayer2 w4: v2@7246.22,1932.74 cw(c7246.22,1906.18) 7265,1924.96 ; v2@7246.22,1936.74 cw(c7246.22,1919.84) 7258.17,1931.79 cw(c7270.12,1943.74) v2@7253.22,1943.74 ; v2(7246.22,1943.74) 7265.92,1924.04 7303.52,1924.04 7305.19,1922.37 7305.19,1889.04 7305.96,1888.27 7305.96,1659.04 7316.63,1648.37 7666.86,1648.37 7806.86,1508.37 8021.86,1508.37 8088.52,1575.04 8140.19,1575.04 v1(8165.19,1600.04) ; v2@7257.22,1943.74 ccw(c7283.78,1943.74) 7265,1924.96 ; v1@8155.69,1600.04 cw(c8132.76,1600.04) 8148.97,1583.82 cw(c8165.19,1567.61) v1@8165.19,1590.54 ; v1@8159.69,1600.04 cw(c8146.41,1600.04) 8155.8,1590.65 cw(c8165.19,1581.26) v1@8165.19,1594.54
HOST_CLK.DIN: U2.12 U30.A2 | length 2217.6
  Top Layer w4: v1(8041.86,3725.04) 8053.7,3725.04 8060,3731.34 ; U2.12@8065.88,3727.24 ccw(c8060,3725.06) 8060,3731.34 ; U2.12@8065.88,3735.43 cw(c8060,3737.61) 8060,3731.34 ; U2.12@8098.58,3731.34 8060,3731.34
  Top Layer w8: U30.A2@7384.02,2199.65 v2(7403.7,2219.33) ; U30.A2@7384.02,2205.49 ccw(c7384.02,2219.59) 7393.99,2209.62 ccw(c7403.96,2199.65) U30.A2@7389.86,2199.65 ; v2@7394.7,2219.33 cw(c7372.97,2219.33) 7388.34,2203.97 cw(c7403.7,2188.6) v2@7403.7,2210.33
  MidLayer1 w4: v1@7625.14,2473.43 ccw(c7608.92,2489.64) 7631.86,2489.64 ccw(c7654.79,2489.64) v1@7638.57,2473.43 ; v1@7627.97,2470.6 ccw(c7618.58,2479.99) 7631.86,2479.99 ccw(c7645.14,2479.99) v1@7635.75,2470.6 ; v1(7631.86,2466.71) 7631.86,2542.04 7756.86,2667.04 7756.86,3191.71 7806.86,3241.71 7806.86,3508.37 7897.86,3599.37 7949.12,3599.37 8041.86,3692.11 v1(8041.86,3725.04) ; v1@8035.14,3718.32 cw(c8018.92,3702.11) 8041.86,3702.11 cw(c8064.79,3702.11) v1@8048.57,3718.32 ; v1@8037.97,3721.15 cw(c8028.58,3711.76) 8041.86,3711.76 cw(c8055.14,3711.76) v1@8045.75,3721.15
  Bottom Layer w4: v2(7403.7,2219.33) 7423.52,2239.15 7423.52,2292.37 7597.86,2466.71 v1(7631.86,2466.71) ; v2@7403.7,2226.33 ccw(c7403.7,2243.23) 7415.65,2231.28 ccw(c7427.6,2219.33) v2@7410.7,2219.33 ; v2@7403.7,2230.33 ccw(c7403.7,2256.89) 7422.48,2238.11 ccw(c7441.26,2219.33) v2@7414.7,2219.33 ; v1@7625.14,2459.99 ccw(c7608.92,2443.77) 7608.92,2466.71 ccw(c7608.92,2489.64) v1@7625.14,2473.43 ; v1@7627.97,2462.82 ccw(c7618.58,2453.43) 7618.58,2466.71 ccw(c7618.58,2479.99) v1@7627.97,2470.6
HOST_CLK.SCLK: U2.8 U30.A8 | length 2810.3
  Top Layer w4: U2.8@7874.17,3581.34 7924.23,3581.34 ; U2.8@7901.33,3575.84 cw(c7914.58,3562.62) 7914.58,3581.34 cw(c7914.58,3600.06) U2.8@7901.33,3586.83 ; U2.8@7904.16,3573.02 cw(c7924.22,3553) 7924.22,3581.34 ; U2.8@7904.16,3589.66 ccw(c7924.22,3609.68) 7924.22,3581.34 ; v1@7930.69,3565.48 ccw(c7908.62,3565.73) 7924.23,3581.34 ; v1@7934.69,3565.44 ccw(c7921.91,3565.58) 7930.95,3574.62 ccw(c7939.98,3583.65) v1@7940.13,3570.87 ; v1@7940.08,3574.87 cw(c7939.84,3596.95) 7924.23,3581.34 ; v1(7940.19,3565.37) 7924.23,3581.34
  Top Layer w8: U30.A8@7384.02,1963.43 v2(7403.7,1983.11) ; U30.A8@7384.02,1969.27 ccw(c7384.02,1983.37) 7393.99,1973.4 ccw(c7403.96,1963.43) U30.A8@7389.86,1963.43 ; v2@7394.7,1983.11 cw(c7372.97,1983.11) 7388.34,1967.75 cw(c7403.7,1952.38) v2@7403.7,1974.11
  MidLayer1 w4: v1(7915,2025) 7915,2023.23 7915.19,2023.04 7990.19,2098.04 7990.19,2258.37 7948.52,2300.04 7948.52,2440.37 7848.52,2540.37 7848.52,2568.04 7848.52,2821.67 7981.86,2955 7981.86,3475.04 7940.19,3516.71 v1(7940.19,3565.37) ; v1@7915,2030.5 ccw(c7915,2048.97) 7928.06,2035.91 ; v1@7915,2034.5 ccw(c7915,2062.62) 7934.89,2042.74 ; v1@7924.5,2025 cw(c7942.25,2025) 7929.7,2037.55 ; v1@7933.47,3558.66 cw(c7917.26,3542.44) 7940.19,3542.44 cw(c7963.13,3542.44) v1@7946.91,3558.66 ; v1@7936.3,3561.49 cw(c7926.91,3552.1) 7940.19,3552.1 cw(c7953.47,3552.1) v1@7944.08,3561.49
  Bottom Layer w4: v2(7403.7,1983.11) 7422.36,2001.76 ; v2@7403.73,1990.11 ccw(c7403.81,2006.74) 7415.57,1994.98 ccw(c7427.33,1983.22) v2@7410.7,1983.14 ; v2@7403.75,1994.11 ccw(c7403.88,2020.24) 7422.35,2001.76 ; v2@7414.7,1983.16 cw(c7440.83,1983.29) 7422.35,2001.76 ; v1@7908.28,2018.28 ccw(c7892.06,2002.06) 7892.06,2025 ccw(c7892.06,2047.93) v1@7908.28,2031.72 ; v1@7911.11,2021.11 ccw(c7901.72,2011.72) 7901.72,2025 ccw(c7901.72,2038.28) v1@7911.11,2028.89 ; v1@7915.19,2023.04 7915,2023.23 v1(7915,2025) 7847.37,2025 7830.75,2008.37 7814.83,2008.37 7790.36,1983.9 7790.36,1972.58 7783.77,1966 7711.23,1966 7702.19,1975.04 7660.52,2016.71 7563.48,2016.71 7555.98,2024.21 7540.32,2024.21 7517.87,2001.76 7422.36,2001.76
HOST_LED1.BLUE: U30.T7 U31.3 | length 5016.8
  Top Layer w4: U31.3@3890.69,3420.99 ccw(c3883.86,3414.16) 3883.86,3423.82 ccw(c3883.86,3433.48) U31.3@3890.69,3426.65 ; U31.3@3920,3423.82 3882.64,3423.82 3864.52,3405.71 3864.52,2945.35 3933.43,2876.45 3933.43,2827.72 4061.15,2700 4165.15,2700 4215.19,2750.04 4256.86,2750.04 4306.86,2700.04 4306.86,1970.45 4348.52,1928.78 v1(4348.52,1900.04) ; v1@4341.81,1906.76 ccw(c4325.59,1922.98) 4348.52,1922.98 ccw(c4371.46,1922.98) v1@4355.24,1906.76 ; v1@4344.64,1903.93 ccw(c4335.25,1913.32) 4348.52,1913.32 ccw(c4361.8,1913.32) v1@4352.41,1903.93
  Top Layer w8: v2@6773.78,2013.48 cw(c6773.78,1991.75) 6789.14,2007.12 cw(c6804.51,2022.48) v2@6782.78,2022.48 ; v2(6773.78,2022.48) U30.T7@6793.46,2002.8 ; U30.T7@6787.62,2002.8 ccw(c6773.52,2002.8) 6783.49,2012.77 ccw(c6793.46,2022.74) U30.T7@6793.46,2008.64
  MidLayer2 w4: v1(5215.19,1858.37) 5215.7,1857.87 5703.97,1857.87 5723.13,1838.71 5895.5,1838.71 5909.17,1825.04 6273.52,1825.04 6315.19,1866.71 6472.31,1866.71 6484.98,1854.04 6755.19,1854.04 6792.86,1891.71 6792.86,2003.4 v2(6773.78,2022.48) ; v2@6773.78,2011.48 cw(c6773.78,1984.92) 6792.56,2003.7 cw(c6811.34,2022.48) v2@6784.78,2022.48 ; v2@6773.78,2015.48 cw(c6773.78,1998.58) 6785.73,2010.53 cw(c6797.68,2022.48) v2@6780.78,2022.48
  Bottom Layer w4: v1(4348.52,1900.04) 4360,1911.52 4360,1960 4372.81,1972.81 4939.44,1972.81 4962.25,1950 5191.92,1950 5215.19,1926.73 v1(5215.19,1858.37) ; v1@5208.47,1865.09 ccw(c5192.26,1881.31) 5215.19,1881.31 ccw(c5238.13,1881.31) v1@5221.91,1865.09 ; v1@5211.3,1862.26 ccw(c5201.91,1871.65) 5215.19,1871.65 ccw(c5228.47,1871.65) v1@5219.08,1862.26
HOST_LED1.GREEN: U30.Y6 U31.5 | length 5166.4
  Top Layer w4: U31.5@3920,3372.64 3967.45,3372.64 3969.86,3375.04 v1(3971.86,3375.04) ; U31.5@3943.12,3372.64 ccw(c3943.12,3403.78) v1@3965.14,3381.76 ; U31.5@3949.31,3369.81 cw(c3956.14,3362.98) 3956.14,3372.64 cw(c3956.14,3382.3) U31.5@3949.31,3375.47 ; 3952.78,3372.64 ccw(c3952.78,3394.12) v1@3967.97,3378.93 ; 3954.72,3372.64 cw(c3954.72,3357.91) v1@3965.14,3368.32
  Top Layer w8: v2@6616.3,2052.85 cw(c6616.3,2031.12) 6631.66,2046.49 cw(c6647.03,2061.85) v2@6625.3,2061.85 ; v2(6616.3,2061.85) U30.Y6@6635.98,2042.17 ; U30.Y6@6630.14,2042.17 ccw(c6616.04,2042.17) 6626.01,2052.14 ccw(c6635.98,2062.11) U30.Y6@6635.98,2048.01
  MidLayer1 w4: v1@3758.47,2880.76 ccw(c3742.26,2896.98) 3765.19,2896.98 ccw(c3788.13,2896.98) v1@3771.91,2880.76 ; v1@3761.3,2877.93 ccw(c3751.91,2887.32) 3765.19,2887.32 ccw(c3778.47,2887.32) v1@3769.08,2877.93 ; v1(3765.19,2874.04) 3765.19,3168.37 v1(3971.86,3375.04) ; v1@3962.36,3375.04 cw(c3939.42,3375.04) 3955.64,3358.82 cw(c3971.86,3342.61) v1@3971.86,3365.54 ; v1@3966.36,3375.04 cw(c3953.08,3375.04) 3962.47,3365.65 cw(c3971.86,3356.26) v1@3971.86,3369.54
  MidLayer2 w4: v1@4225.14,2651.66 ccw(c4208.92,2635.44) 4208.92,2658.37 ccw(c4208.92,2681.31) v1@4225.14,2665.09 ; v1@4227.97,2654.49 ccw(c4218.58,2645.1) 4218.58,2658.37 ccw(c4218.58,2671.65) v1@4227.97,2662.26 ; v1(4231.86,2658.37) 4021.86,2658.37 4006.86,2643.37 4006.86,2491.71 4031.86,2466.71 4431.86,2466.71 4532.71,2567.56 4617.56,2567.56 4691.71,2641.71 4896.52,2641.71 4929.86,2608.37 5116.19,2608.37 5124.52,2616.71 5200,2616.71 5215,2601.71 5215,2575.32 5248.94,2541.37 5644.48,2541.37 5690.86,2495 5690.86,2198.08 5718.57,2170.37 6414.5,2170.37 6493.17,2091.71 6581.86,2091.71 6611.72,2061.85 v2(6616.3,2061.85)
  Bottom Layer w4: v1@3765.19,2864.54 cw(c3765.19,2841.61) 3781.41,2857.82 cw(c3797.63,2874.04) v1@3774.69,2874.04 ; v1@3765.19,2868.54 cw(c3765.19,2855.26) 3774.58,2864.65 cw(c3783.97,2874.04) v1@3770.69,2874.04 ; v1(3765.19,2874.04) 3872.52,2766.71 4162.21,2766.71 4231.86,2697.06 v1(4231.86,2658.37) ; v1@4225.14,2665.09 ccw(c4208.92,2681.31) 4231.86,2681.31 ccw(c4254.79,2681.31) v1@4238.57,2665.09 ; v1@4227.97,2662.26 ccw(c4218.58,2671.65) 4231.86,2671.65 ccw(c4245.14,2671.65) v1@4235.75,2662.26
HOST_LED1.RED: U30.U6 U31.1 | length 4851.1
  Top Layer w4: U31.1@3917.17,3477.83 ccw(c3910.34,3484.66) 3920,3484.66 ccw(c3929.66,3484.66) U31.1@3922.83,3477.83 ; U31.1@3920,3475 3920,3511.9 3906.86,3525.04 3885,3525.04 3860,3525 3845,3510 3845,3430 3856.52,3418.48 3856.52,2942.04 3925.43,2873.13 3925.43,2824.41 4280,2469.84 v4(4280,2345) ; v4@4273.06,2351.94 ccw(c4256.31,2368.69) 4280,2368.69 ccw(c4303.69,2368.69) v4@4286.94,2351.94 ; v4@4275.89,2349.11 ccw(c4265.97,2359.03) 4280,2359.03 ccw(c4294.03,2359.03) v4@4284.11,2349.11
  Top Layer w8: v2@6734.41,2052.85 cw(c6734.41,2031.12) 6749.77,2046.49 cw(c6765.14,2061.85) v2@6743.41,2061.85 ; v2(6734.41,2061.85) U30.U6@6754.09,2042.17 ; U30.U6@6748.25,2042.17 ccw(c6734.15,2042.17) 6744.12,2052.14 ccw(c6754.09,2062.11) U30.U6@6754.09,2048.01
  MidLayer2 w4: v4(4280,2345) 4316.63,2345 4330,2358.37 4881.86,2358.37 4891.02,2349.21 4916.11,2349.21 4926.36,2359.46 4926.36,2488.62 4925,2489.98 4925,2519.75 4955.25,2550 5080.23,2550 5088.86,2541.37 5215,2541.37 5239.67,2516.71 5571.54,2516.71 5665.19,2423.06 5665.19,2189.81 5708.63,2146.37 5963.52,2146.37 6012.57,2097.32 6012.5,2097.25 6012.5,2077.75 6027.75,2062.5 6043.65,2062.5 6083.15,2102 6384.69,2102 6387.69,2105 6400,2105 6410.64,2094.36 6410.64,2081.07 6450,2041.71 6560.19,2041.71 6598.52,2003.37 6665.19,2003.37 6675.19,2013.37 6675.19,2033.37 6683.52,2041.71 6714.27,2041.71 v2(6734.41,2061.85) ; v4@4284.11,2340.89 cw(c4294.03,2330.97) 4294.03,2345 cw(c4294.03,2359.03) v4@4284.11,2349.11 ; v4@4286.94,2338.06 cw(c4303.69,2321.31) 4303.69,2345 cw(c4303.69,2368.69) v4@4286.94,2351.94 ; 6722.46,2049.9 ccw(c6710.51,2061.85) v2@6727.41,2061.85 ; 6722.46,2049.9 cw(c6734.41,2037.95) v2@6734.41,2054.85 ; v2@6723.41,2061.85 cw(c6696.85,2061.85) 6715.63,2043.07 cw(c6734.41,2024.3) v2@6734.41,2050.85
HOST_LED2.BLUE: U30.W4 U31.11 | length 4386.4
  Top Layer w4: U31.11@4138.5,3398.23 4171.77,3398.23 ; v1@4141.81,2740.09 ccw(c4125.59,2756.31) 4148.52,2756.31 ccw(c4171.46,2756.31) v1@4155.24,2740.09 ; v1@4144.64,2737.26 ccw(c4135.25,2746.65) 4148.52,2746.65 ccw(c4161.8,2746.65) v1@4152.41,2737.26 ; v1(4148.52,2733.37) 4148.52,3033.33 4131.86,3050 4131.86,3080 4181.86,3130 4181.86,3388.14 4171.77,3398.23 ; U31.11@4167.56,3395.16 cw(c4171.18,3390.85) 4175.17,3394.83 ; U31.11@4168.48,3396.29 cw(c4171.77,3394.47) 4171.77,3398.23 ; U31.11@4168.48,3400.17 ccw(c4171.77,3401.99) 4171.77,3398.23 ; 4172.08,3397.92 ccw(c4168.36,3394.2) 4164.98,3398.23 cw(c4164.98,3381.84) 4176.57,3393.43
  Top Layer w8: v2@6655.67,2131.59 cw(c6655.67,2109.86) 6671.03,2125.23 cw(c6686.4,2140.59) v2@6664.67,2140.59 ; v2(6655.67,2140.59) U30.W4@6675.35,2120.91 ; U30.W4@6669.51,2120.91 ccw(c6655.41,2120.91) 6665.38,2130.88 ccw(c6675.35,2140.85) U30.W4@6675.35,2126.75
  MidLayer1 w4: v1(5565.19,2583.37) 5598.52,2583.37 5623.52,2558.37 5623.52,2475.04 5665.19,2433.37 5665.19,2169.08 5684.23,2150.04 6004.96,2150.04 6030,2125 v1(6030,2085) ; v1@5569.08,2579.49 cw(c5578.47,2570.1) 5578.47,2583.37 cw(c5578.47,2596.65) v1@5569.08,2587.26 ; v1@5571.91,2576.66 cw(c5588.13,2560.44) 5588.13,2583.37 cw(c5588.13,2606.31) v1@5571.91,2590.09 ; v1@6023.28,2091.72 ccw(c6007.06,2107.93) 6030,2107.93 ccw(c6052.93,2107.93) v1@6036.72,2091.72 ; v1@6026.11,2088.89 ccw(c6016.72,2098.28) 6030,2098.28 ccw(c6043.28,2098.28) v1@6033.89,2088.89
  MidLayer2 w4: v1(4148.52,2733.37) 4191.67,2733.37 4225,2700.04 4845.52,2700.04 4920.52,2775.04 5106.19,2775.04 5181.86,2699.37 5231.86,2699.37 5240.86,2708.37 5490.19,2708.37 5565.19,2633.37 v1(5565.19,2583.37) ; v1@4152.41,2729.49 cw(c4161.8,2720.1) 4161.8,2733.37 cw(c4161.8,2746.65) v1@4152.41,2737.26 ; v1@4155.24,2726.66 cw(c4171.46,2710.44) 4171.46,2733.37 cw(c4171.46,2756.31) v1@4155.24,2740.09 ; v1@5558.47,2590.09 ccw(c5542.26,2606.31) 5565.19,2606.31 ccw(c5588.13,2606.31) v1@5571.91,2590.09 ; v1@5561.3,2587.26 ccw(c5551.91,2596.65) 5565.19,2596.65 ccw(c5578.47,2596.65) v1@5569.08,2587.26 ; v1(6030,2085) 6055,2110 6380,2110 6385,2115 6412.23,2115 v1(6427.19,2100.04) ; v1@6030,2090.5 ccw(c6030,2103.78) 6039.39,2094.39 ccw(c6048.78,2085) v1@6035.5,2085 ; v1@6030,2094.5 ccw(c6030,2117.43) 6046.22,2101.22 ccw(c6062.43,2085) v1@6039.5,2085
  Bottom Layer w4: v1(6427.19,2100.04) 6448.52,2121.37 6636.52,2121.37 6640.19,2125.04 6640.19,2125.11 v2(6655.67,2140.59) ; v1@6427.19,2105.54 ccw(c6427.19,2118.82) 6436.58,2109.43 ccw(c6445.97,2100.04) v1@6432.69,2100.04 ; v1@6427.19,2109.54 ccw(c6427.19,2132.48) 6443.41,2116.26 ccw(c6459.63,2100.04) v1@6436.69,2100.04
HOST_LED2.GREEN: U30.Y4 U31.13 | length 4242.6
  Top Layer w4: v1@4089.81,2808.76 ccw(c4073.59,2824.98) 4096.52,2824.98 ccw(c4119.46,2824.98) v1@4103.24,2808.76 ; v1@4092.64,2805.93 ccw(c4083.25,2815.32) 4096.52,2815.32 ccw(c4109.8,2815.32) v1@4100.41,2805.93 ; v1(4096.52,2802.04) 4096.52,3273.48 4057.19,3312.81 4057.19,3338 3994.36,3400.83 3994.36,3423.96 4012.94,3442.54 4024.73,3442.54 4040.23,3458.04 4089.89,3458.04 4098.52,3449.41 U31.13@4138.5,3449.41 ; U31.13@4109.2,3446.58 ccw(c4102.37,3439.75) 4102.37,3449.41 ccw(c4102.37,3459.07) U31.13@4109.2,3452.24
  Top Layer w8: v2@6616.3,2131.59 cw(c6616.3,2109.86) 6631.66,2125.23 cw(c6647.03,2140.59) v2@6625.3,2140.59 ; v2(6616.3,2140.59) U30.Y4@6635.98,2120.91 ; U30.Y4@6630.14,2120.91 ccw(c6616.04,2120.91) 6626.01,2130.88 ccw(c6635.98,2140.85) U30.Y4@6635.98,2126.75
  MidLayer2 w4: v1(4473.52,2725.04) 4618.86,2725.04 4632.76,2738.95 4703.19,2809.37 5049.52,2809.37 5081.86,2841.71 5210.52,2841.71 5252.19,2800.04 5441.92,2800.04 5458.59,2816.71 5487.86,2816.71 5562.86,2741.71 5723.52,2741.71 5798.52,2666.71 5798.52,2518.54 5867.02,2450.04 6015.19,2450.04 6156.86,2308.37 6323.52,2308.37 6348.52,2283.37 6348.52,2233.37 6379.52,2202.37 6427.76,2202.37 6489.54,2140.59 v2(6616.3,2140.59) v2@6616.3,2141.71 ; v1@4477.41,2721.15 cw(c4486.8,2711.76) 4486.8,2725.04 cw(c4486.8,2738.32) v1@4477.41,2728.93 ; v1@4480.24,2718.32 cw(c4496.46,2702.11) 4496.46,2725.04 cw(c4496.46,2747.98) v1@4480.24,2731.76 ; v2@6608.52,2132.81 ccw(c6589.74,2114.03) 6589.74,2140.59 ccw(c6589.74,2167.15) v2@6608.52,2148.37 ; v2@6611.35,2135.64 ccw(c6599.4,2123.69) 6599.4,2140.59 ccw(c6599.4,2157.49) v2@6611.35,2145.54
  Bottom Layer w4: v1@4096.52,2792.54 cw(c4096.52,2769.61) 4112.74,2785.82 cw(c4128.96,2802.04) v1@4106.02,2802.04 ; v1@4096.52,2796.54 cw(c4096.52,2783.26) 4105.91,2792.65 cw(c4115.3,2802.04) v1@4102.02,2802.04 ; v1(4096.52,2802.04) 4115.19,2783.37 4168.17,2783.37 4201.5,2750.04 4281.86,2750.04 4306.86,2725.04 v1(4473.52,2725.04) ; v1@4466.81,2718.32 ccw(c4450.59,2702.11) 4450.59,2725.04 ccw(c4450.59,2747.98) v1@4466.81,2731.76 ; v1@4469.64,2721.15 ccw(c4460.25,2711.76) 4460.25,2725.04 ccw(c4460.25,2738.32) v1@4469.64,2728.93
HOST_LED2.RED: U30.Y5 U31.9 | length 3845.7
  Top Layer w4: v1(4090.19,3333.37) 4103.86,3347.05 ; U31.9@4108.86,3344.6 ccw(c4103.86,3340.73) 4103.86,3347.05 ; U31.9@4108.86,3349.5 cw(c4103.86,3353.37) 4103.86,3347.05 ; U31.9@4140.19,3347.05 U31.9@4138.5,3347.05 4103.86,3347.05
  Top Layer w8: v2@6616.3,2092.22 cw(c6616.3,2070.49) 6631.66,2085.86 cw(c6647.03,2101.22) v2@6625.3,2101.22 ; v2(6616.3,2101.22) U30.Y5@6635.98,2081.54 ; U30.Y5@6630.14,2081.54 ccw(c6616.04,2081.54) 6626.01,2091.51 ccw(c6635.98,2101.48) U30.Y5@6635.98,2087.38
  MidLayer1 w4: v1(5415.19,2891.71) 5405.52,2882.04 5405.52,2801.37 v1(5431.86,2775.04) ; v1@5422.36,2775.04 ccw(c5399.42,2775.04) 5415.64,2791.26 ccw(c5431.86,2807.48) v1@5431.86,2784.54 ; v1@5426.36,2775.04 ccw(c5413.08,2775.04) 5422.47,2784.43 ccw(c5431.86,2793.82) v1@5431.86,2780.54
  MidLayer2 w4: v1(5431.86,2775.04) 5465.19,2808.37 5484.88,2808.37 5559.88,2733.37 5720.54,2733.37 5790.52,2663.39 5790.52,2515.22 5915.19,2390.56 5915.19,2303.04 6031.86,2186.37 6421.13,2186.37 6499.13,2108.37 6616.3,2108.37 v2(6616.3,2101.22) ; v1@5431.86,2780.54 ccw(c5431.86,2793.82) 5441.25,2784.43 ccw(c5450.64,2775.04) v1@5437.36,2775.04 ; v1@5431.86,2784.54 ccw(c5431.86,2807.48) 5448.07,2791.26 ccw(c5464.29,2775.04) v1@5441.36,2775.04
  Bottom Layer w4: v1(4090.19,3333.37) 4076.19,3319.37 4076.19,3036.67 4121.82,2991.04 4418.48,2991.04 4484.48,2925.04 4798.52,2925.04 4865.19,2858.37 5103.82,2858.37 5121.15,2841.04 5184.88,2841.04 5245.21,2901.37 5314.46,2901.37 5322.29,2893.54 5343.42,2893.54 5352.08,2902.2 5374.34,2902.2 5384.84,2891.71 v1(5415.19,2891.71) ; v1@5408.47,2884.99 ccw(c5392.26,2868.77) 5392.26,2891.71 ccw(c5392.26,2914.64) v1@5408.47,2898.43 ; v1@5411.3,2887.82 ccw(c5401.91,2878.43) 5401.91,2891.71 ccw(c5401.91,2904.99) v1@5411.3,2895.6
HOST_M0: R158.1 U30.V4 | length 1787.6
  Top Layer w8: v2@6695.04,2131.59 cw(c6695.04,2109.86) 6710.4,2125.23 cw(c6725.77,2140.59) v2@6704.04,2140.59 ; v2(6695.04,2140.59) U30.V4@6714.72,2120.91 ; U30.V4@6708.88,2120.91 ccw(c6694.78,2120.91) 6704.75,2130.88 ccw(c6714.72,2140.85) U30.V4@6714.72,2126.75
  MidLayer1 w4: v1(5850,2080) 5881.86,2048.14 5881.86,1791.71 ; v1(5857.86,1775.04) 5865.19,1775.04 5881.86,1791.71 ; v1@5858.09,1776.52 ccw(c5860.41,1791) 5870.78,1780.63 ; v1@5858.73,1780.47 ccw(c5861.95,1800.54) 5876.32,1786.17 ; v1@5859.36,1784.42 ccw(c5863.48,1810.09) 5881.86,1791.71 ; v1@5867.36,1775.04 cw(c5872.59,1775.04) 5868.89,1778.74 ; 5859.39,2070.61 cw(c5868.78,2080) 5855.5,2080 ccw(c5868.78,2080) 5859.39,2070.61 ; 5859.39,2070.61 ccw(c5850,2061.22) 5850,2074.5 cw(c5850,2061.22) 5859.39,2070.61 ; 5866.22,2063.78 cw(c5882.43,2080) 5859.5,2080 ccw(c5882.43,2080) 5866.22,2063.78 ; 5866.22,2063.78 ccw(c5850,2047.56) 5850,2070.5 cw(c5850,2047.56) 5866.22,2063.78
  Bottom Layer w4: R158.1@5833.29,1737.08 ccw(c5817.38,1752.99) 5839.88,1752.99 ccw(c5862.37,1752.99) R158.1@5846.46,1737.08 ; R158.1@5836.11,1734.25 ccw(c5827.03,1743.33) 5839.88,1743.33 ccw(c5852.71,1743.33) R158.1@5843.64,1734.25 ; R158.1@5839.87,1730 5839.88,1764.73 5850.19,1775.04 v1(5857.86,1775.04) ; 5840.86,1765.71 cw(c5852.05,1754.53) v1@5856.36,1769.75 ; 5845.68,1770.53 cw(c5854.18,1762.04) v1@5857.45,1773.6 ; v1@5850,2070.5 cw(c5850,2047.32) 5866.39,2063.71 ; v1@5850,2074.5 cw(c5850,2060.98) 5859.56,2070.54 ; v1(5850,2080) 5850.05,2080.05 5867.1,2063 5999.56,2063 6040.38,2022.19 6354,2022.19 6356.19,2024.37 6413.86,2082.04 6626.86,2082.04 6636.52,2091.71 6636.52,2109.37 6647.52,2120.37 6674.82,2120.37 v2(6695.04,2140.59) ; v1@5855.5,2080 ccw(c5868.53,2080) 5859.32,2070.78 ; v1@5859.5,2080 ccw(c5882.19,2080) 5866.15,2063.96 ; v2@6684.04,2140.59 cw(c6657.48,2140.59) 6676.26,2121.81 cw(c6695.04,2103.04) v2@6695.04,2129.59 ; v2@6688.04,2140.59 cw(c6671.14,2140.59) 6683.09,2128.64 cw(c6695.04,2116.69) v2@6695.04,2133.59